# Altium PCB HamonLite_pcb.PcbDoc (part 1 of 2)
Units mm, origin at the board's own origin, x right, y up, seen from the top; angles counter-clockwise.
Board outline 85 x 83.5 mm, 4 copper layers (Top Layer, Int1 (GND), Int2 (PWR), Bottom Layer), stack 1.01 mm thick; 333 components, 256 nets, 1688 pads, 134 vias.
Unrouted connection lines stored in the file: 1037.
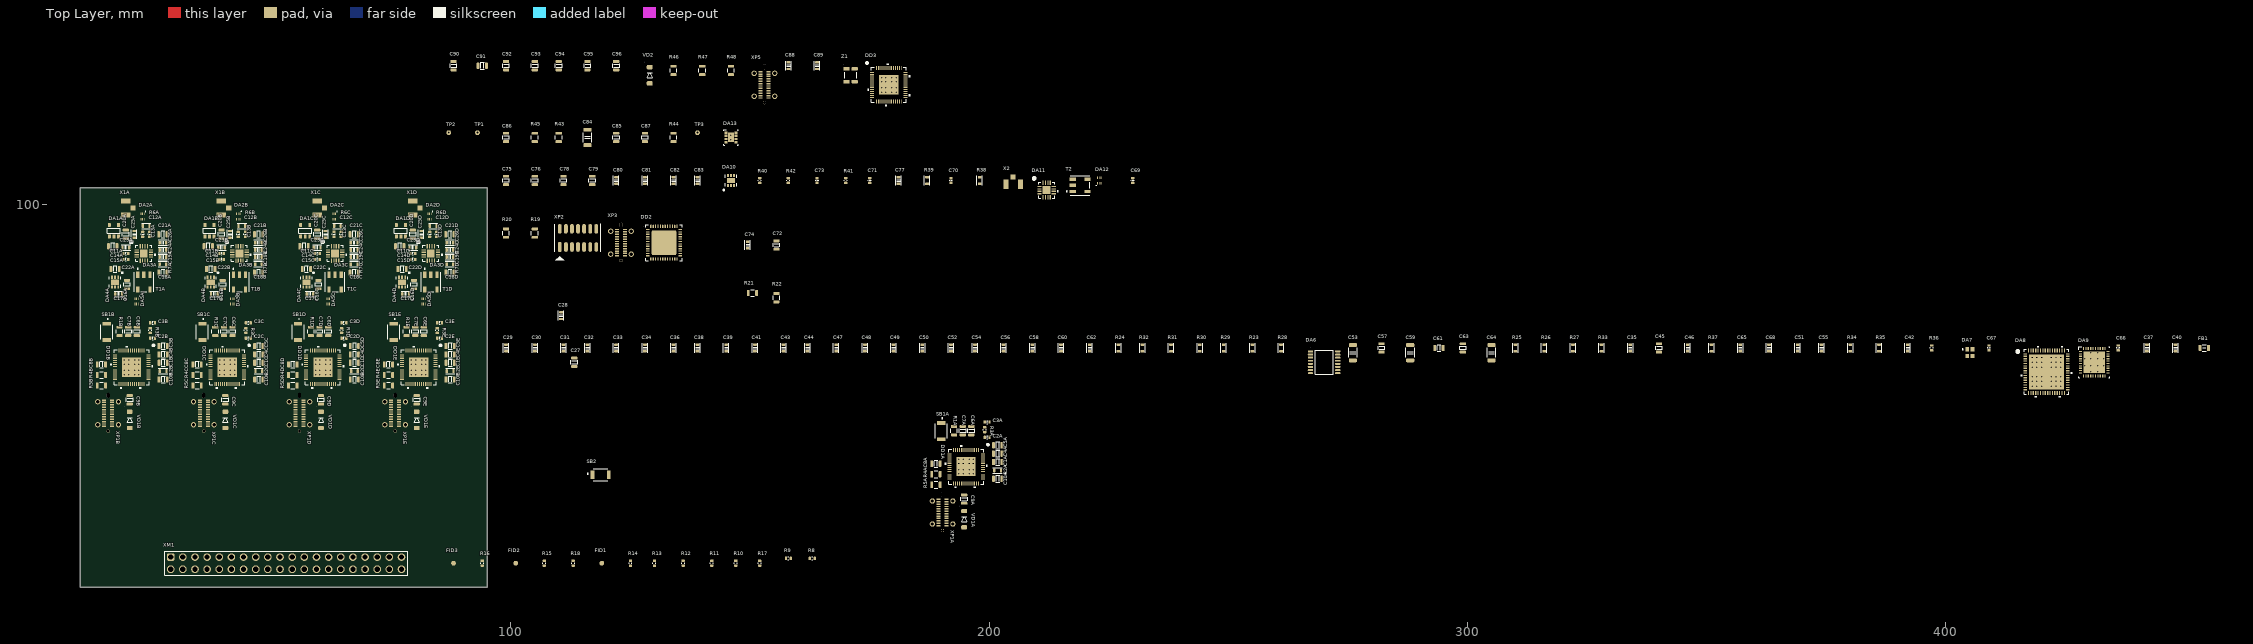
[diagram p0: Top Layer view]
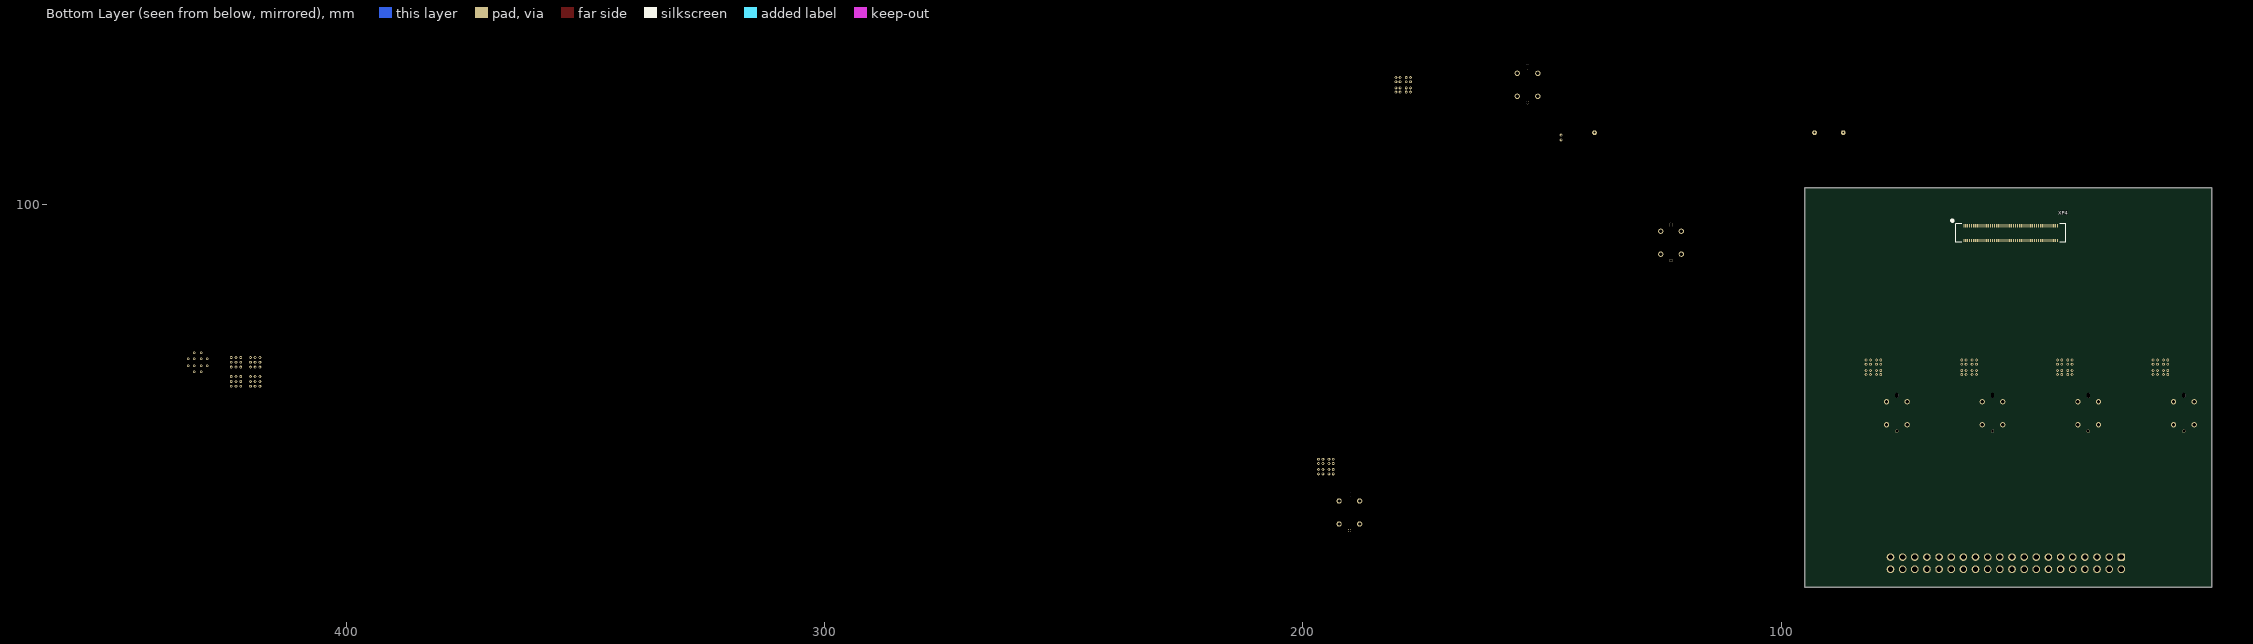
[diagram p1: Bottom Layer view, seen from below]

## Layer stack, top to bottom
Top Solder: solder mask 0.0254, SM-001, Dk 4
Top Layer: signal copper 0.0175
Dielectric 1: prepreg 0.115, PP-016, Dk 4.4
Int1 (GND): signal copper 0.0175
Dielectric 3: core 0.71, Core-043, Dk 4.3
Int2 (PWR): signal copper 0.0175
Dielectric 5: prepreg 0.115, PP-016, Dk 4.4
Bottom Layer: signal copper 0.0175
Bottom Solder: solder mask 0.0254, SM-001, Dk 4

## Board outline
10,20 10,103.5 95,103.5 95,20

## Design rules (kind name [scope] priority, off if disabled: settings)
AcuteAngle [All] p1: minimum=3.50000000000000E+0001 checktracksonly=FALSE
BoardOutlineClearance "BoardOutlineClearance 1" [All] p1: gap=0.25 ignorepadtopadclearanceinfootprint=FALSE except(0: Arc-SplitContinuation Track-SplitContinuation SMDPad-OutlineEdge SMDPad-SplitContinuation THPad-SplitContinuation Via-SplitContinuation Fill-SplitContinuation Poly-SplitContinuation Region-SplitContinuation Text-SplitContinuation) // Milling
BoardOutlineClearance "BoardOutlineClearance 2" [All] p2: gap=0.4 ignorepadtopadclearanceinfootprint=FALSE except(0: Arc-SplitContinuation Track-SplitContinuation SMDPad-SplitContinuation THPad-SplitContinuation Via-SplitContinuation Fill-SplitContinuation Poly-SplitContinuation Region-SplitContinuation Text-SplitContinuation) // V-Cut
Clearance "Fid Poly Clearance" [HasFootprint('FIDMARK')] p1: gap=0.2 ignorepadtopadclearanceinfootprint=FALSE except(0.8: SMDPad-Fill SMDPad-Poly SMDPad-Region THPad-Fill THPad-Poly THPad-Region)
Clearance "Clearance-1 1/2 Oz" [All] p2: gap=0.125 ignorepadtopadclearanceinfootprint=TRUE except(0.2: Arc-Fill Arc-Poly Track-Fill Track-Poly SMDPad-SMDPad SMDPad-Fill SMDPad-Poly THPad-Fill THPad-Poly Via-Fill Via-Poly Fill-Fill Fill-Poly Poly-Poly Poly-Region Poly-Text; 0.25: Arc-Hole Track-Hole SMDPad-Hole THPad-Hole Via-Hole Fill-Hole Poly-Hole Region-Hole Text-Hole) // Standart
DiffPairsRouting "DiffPairsRouting 1/2 Oz" [All] p1: maxlimit=0.254 minlimit=0.15 mostfreqgap=0.254 toplayer_minwidth=0.15 toplayer_maxwidth=0.381 toplayer_prefwidth=0.381 midlayer1_minwidth=0.15 midlayer1_maxwidth=0.381 midlayer1_prefwidth=0.381 midlayer2_minwidth=0.15 midlayer2_maxwidth=0.381 midlayer2_prefwidth=0.381 bottomlayer_minwidth=0.15 bottomlayer_maxwidth=0.381 bottomlayer_prefwidth=0.381 maxuncoupledlength=12.7
HoleSize "Minimum HoleSize" [IsPad] p1: absolutevalues=TRUE maxlimit=5.9 minlimit=0.3 maxpercent=80.000 minpercent=20.000
HoleSize "Minimum HoleSize VIA 1" [IsVia] p2: absolutevalues=TRUE maxlimit=4.5 minlimit=0.25 maxpercent=80.000 minpercent=20.000 // Standart
HoleToHoleClearance Hole2HoleClearance [All] p1: gap=0.2 allowstackedmicrovias=FALSE
MinimumAnnularRing "Minimum AR VIA Standart" [IsVia] p1: minimumring=0.15
MinimumAnnularRing "Minimum AR PAD Standart" [IsPAD] p2: minimumring=0.2
MinimumAnnularRing "Minimum AR VIA Advance" [IsVia] p3: minimumring=0.1
MinimumAnnularRing "Minimum AR PAD Advance" [IsPAD] p4: minimumring=0.15
MinimumSolderMaskSliver "SolderMask Bridge Standart" [All] p1: minsoldermaskwidth=0.09 // All Masks
PlaneClearance "PlaneClearance-1 1/2 Oz" [All] p1: clearance=2 // Standart
PlaneConnect "TermalConnect-1 1/2 Oz" [All] p1: planeconnectstyle=Relief reliefexpansion=0.2 reliefentries=4 reliefconductorwidth=0.2 reliefairgap=0.2 // Standart
PolygonConnect "PolygonConnect-1 1/2 Oz" [All] p1: thpad.connectstyle=Relief thpad.reliefconductorwidth=0.15 thpad.reliefentries=4 thpad.polygonreliefangle="90 Angle" thpad.airgapwidth=0.2 smdpad.connectstyle=Relief smdpad.reliefconductorwidth=0.2 smdpad.reliefentries=4 smdpad.polygonreliefangle="90 Angle" smdpad.airgapwidth=0.2 via.connectstyle=Direct via.reliefconductorwidth=0.254 via.reliefentries=4 via.polygonreliefangle="90 Angle" via.airgapwidth=0.254 // Standart
RoomDefinition RX [InComponentClass('RX')] p1: confinementstyle=ConfineIn formatcopy=TRUE lockcomponents=FALSE outline 185.7,56.8 185.7,29.5 205.7,29.5 205.7,56.8
RoomDefinition RX3 [InComponentClass('RX3')] p2: confinementstyle=ConfineIn formatcopy=TRUE lockcomponents=FALSE outline 71.25,77.55 71.25,50.25 91.25,50.25 91.25,77.55
RoomDefinition RX2 [InComponentClass('RX2')] p3: confinementstyle=ConfineIn formatcopy=TRUE lockcomponents=FALSE outline 51.25,77.55 51.25,50.25 71.25,50.25 71.25,77.55
RoomDefinition RX1 [InComponentClass('RX1')] p4: confinementstyle=ConfineIn formatcopy=TRUE lockcomponents=FALSE outline 31.25,77.55 31.25,50.25 51.25,50.25 51.25,77.55
RoomDefinition RX0 [InComponentClass('RX0')] p5: confinementstyle=ConfineIn formatcopy=TRUE lockcomponents=FALSE outline 11.25,77.55 11.25,50.25 31.25,50.25 31.25,77.55
RoomDefinition FE3 [InComponentClass('FE3')] p6: confinementstyle=ConfineIn formatcopy=TRUE lockcomponents=FALSE outline 75,103 75,78 90,78 90,103
RoomDefinition FE2 [InComponentClass('FE2')] p7: confinementstyle=ConfineIn formatcopy=TRUE lockcomponents=FALSE outline 55,103 55,78 70,78 70,103
RoomDefinition FE1 [InComponentClass('FE1')] p8: confinementstyle=ConfineIn formatcopy=TRUE lockcomponents=FALSE outline 35,103 35,78 50,78 50,103
RoomDefinition FE0 [InComponentClass('FE0')] p9: confinementstyle=ConfineIn formatcopy=TRUE lockcomponents=FALSE outline 15,103 15,78 30,78 30,103
RoutingCorners [All] p1 off: cornerstyle=45-Degree minsetback=2.54 maxsetback=2.54
RoutingVias [All] p1: holewidth=0.3 width=0.6 viastyle="Through Hole" minholewidth=0.2 minwidth=0.4 maxholewidth=5.9 maxwidth=6.4
SilkToSilkClearance Silk2SilkClearance [All] p1 off: silktosilkclearance=0.15
SilkToSolderMaskClearance Silk2SolderMaskClearance [IsPad] p1 off: minsilkscreentomaskgap=0.15 clearancetoexposedcopper=TRUE
SolderMaskExpansion SolderMaskExpansion-1 [All] p1: expansion=0.05 istentingtop=FALSE // Standart
UnRoutedNet [All] p1: checkbadconnections=TRUE
Width RF_trace [InNetClass('RF')] p1: maxlimit=0.447 minlimit=0.15 preferedwidth=0.447 impedanceprofiledriven=TRUE minimp=50.000000 maximp=50.000000 favimp=50.000000
Width "Width 1/2 Oz" [All] p2: maxlimit=0.5 minlimit=0.125 preferedwidth=0.25 checkconnectedcopper=TRUE
20 further rules are at their usual default settings.

## Classes and differential pairs
channel class s3-sdr: RX RX0 RX1 RX2 RX3
channel class frontend: FE0 FE1 FE2 FE3
net class SPI_CLK[0..4]: SPI_CLK0 SPI_CLK1 SPI_CLK2 SPI_CLK3 SPI_CLK4
net class RF: IFA IFB IFC IFD IFE NetC2A_2 NetC2B_2 NetC2C_2 NetC2D_2 NetC2E_2 NetC12A_2 NetC12B_2 NetC12C_2 NetC12D_2 NetC69_2 NetDA5A_1 NetDA5B_1 NetDA5C_1 NetDA5D_1 NetDA12_1 RF_IN0 RF_IN1 RF_IN2 RF_IN3
net class RF_IN[0..3]: RF_IN0 RF_IN1 RF_IN2 RF_IN3
net class PHASE_SYNC[0..3]: PHASE_SYNC0 PHASE_SYNC1 PHASE_SYNC2 PHASE_SYNC3
net class LO[0..3]: LO0 LO1 LO2 LO3
net class IO3S[0..4]: IO3S0 IO3S1 IO3S2 IO3S3 IO3S4
net class IO2S[0..4]: IO2S0 IO2S1 IO2S2 IO2S3 IO2S4
net class IO1S[0..4]: IO1S0 IO1S1 IO1S2 IO1S3 IO1S4
net class IO0S[0..4]: IO0S0 IO0S1 IO0S2 IO0S3 IO0S4
net class FE_SYNC_CLK: CLK_IN0 CLK_IN1 CLK_IN2 CLK_IN3 CLK_IN4 NetDA6_3 NetDA6_6 NetDA6_8 NetDA6_9 NetDA6_11
net class CS[0..4]: CS0 CS1 CS2 CS3 CS4
net class CLK_IN[0..4]: CLK_IN0 CLK_IN1 CLK_IN2 CLK_IN3 CLK_IN4
net class ANTBIAS[0..3]: ANTBIAS0 ANTBIAS1 ANTBIAS2 ANTBIAS3
component class U_s3_dsp: C88 C89 C90 C91 C92 C93 C94 C95 C96 DD3 R46 R47 R48 SB2 VD2 XP5 Z1
component class U_power: C84 C85 C86 C87 DA13 R43 R44 R45 TP1 TP2 TP3
component class U_frontend_tx: C69 C70 C71 C72 C73 C74 C75 C76 C77 C78 C79 C80 C81 C82 C83 DA10 DA11 DA12 R38 R39 R40 R41 R42 T2 X2
component class U_DSP_interconnect: DD2 R19 R20 R21 R22 XM1 XP2 XP3
component class U_clock: C27 C28 C29 C30 C31 C32 C33 C34 C35 C36 C37 C38 C39 C40 C41 C42 C43 C44 C45 C46 C47 C48 C49 C50 C51 C52 C53 C54 C55 C56 C57 C58 C59 C60 C61 C62 C63 C64 C65 C66 C67 C68 DA6 DA7 DA8 DA9 FB1 R23 R24 R25 R26 R27 R28 R29 R30 R31 R32 R33 R34 R35 R36 R37
component class U_b2b_ant_plate: XP4
component class RX: C1A C2A C3A C4A C5A C6A C7A C8A C9A C10A DD1A R1A R2A R3A R4A R5A SB1A VD1A XP1A
component class RX3: C1E C2E C3E C4E C5E C6E C7E C8E C9E C10E DD1E R1E R2E R3E R4E R5E SB1E VD1E XP1E
component class RX2: C1D C2D C3D C4D C5D C6D C7D C8D C9D C10D DD1D R1D R2D R3D R4D R5D SB1D VD1D XP1D
component class RX1: C1C C2C C3C C4C C5C C6C C7C C8C C9C C10C DD1C R1C R2C R3C R4C R5C SB1C VD1C XP1C
component class RX0: C1B C2B C3B C4B C5B C6B C7B C8B C9B C10B DD1B R1B R2B R3B R4B R5B SB1B VD1B XP1B
component class main: FID1 FID2 FID3 R8 R9 R10 R11 R12 R13 R14 R15 R16 R17 R18
component class FE3: C11D C12D C13D C14D C15D C16D C17D C18D C19D C20D C21D C22D C23D C24D C25D C26D DA1D DA2D DA3D DA4D DA5D R6D R7D T1D X1D
component class FE2: C11C C12C C13C C14C C15C C16C C17C C18C C19C C20C C21C C22C C23C C24C C25C C26C DA1C DA2C DA3C DA4C DA5C R6C R7C T1C X1C
component class FE1: C11B C12B C13B C14B C15B C16B C17B C18B C19B C20B C21B C22B C23B C24B C25B C26B DA1B DA2B DA3B DA4B DA5B R6B R7B T1B X1B
component class FE0: C11A C12A C13A C14A C15A C16A C17A C18A C19A C20A C21A C22A C23A C24A C25A C26A DA1A DA2A DA3A DA4A DA5A R6A R7A T1A X1A
differential pair USB_DE: +USB_DE_P -USB_DE_N
differential pair USB_DD: +USB_DD_P -USB_DD_N
differential pair USB_DC: +USB_DC_P -USB_DC_N
differential pair USB_DB: +USB_DB_P -USB_DB_N
differential pair USB_DA: +USB_DA_P -USB_DA_N
differential pair USB_D_9: +USB_D_9_P -USB_D_9_N
differential pair USB_D_4: +USB_D_4_P -USB_D_4_N
differential pair SYNTH_CLK_5: +SYNTH_CLK_5_P -SYNTH_CLK_5_N
differential pair IFD: +IFD_P -IFD_N
differential pair IFC: +IFC_P -IFC_N
differential pair IFB: +IFB_P -IFB_N
differential pair IFA: +IFA_P -IFA_N
differential pair IF_7: +IF_7_P -IF_7_N

## Components (designator, comment, footprint, x,y, rotation, side; value= is the part's Value field where it differs from the comment)
C1A "0.1" C0805C 201.75,46.15 r0 top (schematic designator C1)
C1B "0.1" C0805C 27.3,66.9 r0 top (schematic designator C1)
C1C "0.1" C0805C 47.3,66.9 r0 top (schematic designator C1)
C1D "0.1" C0805C 67.3,66.9 r0 top (schematic designator C1)
C1E "0.1" C0805C 87.3,66.9 r0 top (schematic designator C1)
C2A "DNP" C0402C 199.55,51.3 r180 top (schematic designator C2)
C2B "DNP" C0402C 25.1,72.05 r180 top (schematic designator C2)
C2C "DNP" C0402C 45.1,72.05 r180 top (schematic designator C2)
C2D "DNP" C0402C 65.1,72.05 r180 top (schematic designator C2)
C2E "DNP" C0402C 85.1,72.05 r180 top (schematic designator C2)
C3A "DNP" C0402C 199.55,54.5 r180 top (schematic designator C3)
C3B "DNP" C0402C 25.1,75.25 r180 top (schematic designator C3)
C3C "DNP" C0402C 45.1,75.25 r180 top (schematic designator C3)
C3D "DNP" C0402C 65.1,75.25 r180 top (schematic designator C3)
C3E "DNP" C0402C 85.1,75.25 r180 top (schematic designator C3)
C4A "0.1" C0805C 201.75,47.9 r0 top (schematic designator C4)
C4B "0.1" C0805C 27.3,68.65 r0 top (schematic designator C4)
C4C "0.1" C0805C 47.3,68.65 r0 top (schematic designator C4)
C4D "0.1" C0805C 67.3,68.65 r0 top (schematic designator C4)
C4E "0.1" C0805C 87.3,68.65 r0 top (schematic designator C4)
C5A "0.1" C0805C 201.75,49.65 r0 top (schematic designator C5)
C5B "0.1" C0805C 27.3,70.4 r0 top (schematic designator C5)
C5C "0.1" C0805C 47.3,70.4 r0 top (schematic designator C5)
C5D "0.1" C0805C 67.3,70.4 r0 top (schematic designator C5)
C5E "0.1" C0805C 87.3,70.4 r0 top (schematic designator C5)
C6A "0.1" C0805C 196.25,52.7 r90 top (schematic designator C6)
C6B "0.1" C0805C 21.8,73.45 r90 top (schematic designator C6)
C6C "0.1" C0805C 41.8,73.45 r90 top (schematic designator C6)
C6D "0.1" C0805C 61.8,73.45 r90 top (schematic designator C6)
C6E "0.1" C0805C 81.8,73.45 r90 top (schematic designator C6)
C7A "0.1" C0805C 194.45,52.7 r90 top (schematic designator C7)
C7B "0.1" C0805C 20,73.45 r90 top (schematic designator C7)
C7C "0.1" C0805C 40,73.45 r90 top (schematic designator C7)
C7D "0.1" C0805C 60,73.45 r90 top (schematic designator C7)
C7E "0.1" C0805C 80,73.45 r90 top (schematic designator C7)
C8A "0.1" C0805C 188.85,45.8 r180 top (schematic designator C8)
C8B "0.1" C0805C 14.4,66.55 r180 top (schematic designator C8)
C8C "0.1" C0805C 34.4,66.55 r180 top (schematic designator C8)
C8D "0.1" C0805C 54.4,66.55 r180 top (schematic designator C8)
C8E "0.1" C0805C 74.4,66.55 r180 top (schematic designator C8)
C9A "0.1" C0805C 194.75,38.4 r270 top (schematic designator C9)
C9B "0.1" C0805C 20.3,59.15 r270 top (schematic designator C9)
C9C "0.1" C0805C 40.3,59.15 r270 top (schematic designator C9)
C9D "0.1" C0805C 60.3,59.15 r270 top (schematic designator C9)
C9E "0.1" C0805C 80.3,59.15 r270 top (schematic designator C9)
C10A "0.1" C0805C 201.75,42.65 r0 top (schematic designator C10)
C10B "0.1" C0805C 27.3,63.4 r0 top (schematic designator C10)
C10C "0.1" C0805C 47.3,63.4 r0 top (schematic designator C10)
C10D "0.1" C0805C 67.3,63.4 r0 top (schematic designator C10)
C10E "0.1" C0805C 87.3,63.4 r0 top (schematic designator C10)
C11A "1" C0805C 16.75,91.25 r0 top (schematic designator C11)
C11B "1" C0805C 36.75,91.25 r0 top (schematic designator C11)
C11C "1" C0805C 56.75,91.25 r0 top (schematic designator C11)
C11D "1" C0805C 76.75,91.25 r0 top (schematic designator C11)
C12A "1000p" C0402C 23,93.75 r270 top (schematic designator C12)
C12B "1000p" C0402C 43,93.75 r270 top (schematic designator C12)
C12C "1000p" C0402C 63,93.75 r270 top (schematic designator C12)
C12D "1000p" C0402C 83,93.75 r270 top (schematic designator C12)
C13A "1000p" C0402C 24.5,93.75 r90 top (schematic designator C13)
C13B "1000p" C0402C 44.5,93.75 r90 top (schematic designator C13)
C13C "1000p" C0402C 64.5,93.75 r90 top (schematic designator C13)
C13D "1000p" C0402C 84.5,93.75 r90 top (schematic designator C13)
C14A "1000p" C0402C 19.5,89.75 r0 top (schematic designator C14)
C14B "1000p" C0402C 39.5,89.75 r0 top (schematic designator C14)
C14C "1000p" C0402C 59.5,89.75 r0 top (schematic designator C14)
C14D "1000p" C0402C 79.5,89.75 r0 top (schematic designator C14)
C15A "1000p" C0402C 19.5,88.5 r0 top (schematic designator C15)
C15B "1000p" C0402C 39.5,88.5 r0 top (schematic designator C15)
C15C "1000p" C0402C 59.5,88.5 r0 top (schematic designator C15)
C15D "1000p" C0402C 79.5,88.5 r0 top (schematic designator C15)
C16A "22" C0805C 19.75,83.25 r90 top (schematic designator C16)
C16B "22" C0805C 39.75,83.25 r90 top (schematic designator C16)
C16C "22" C0805C 59.75,83.25 r90 top (schematic designator C16)
C16D "22" C0805C 79.75,83.25 r90 top (schematic designator C16)
C17A "100p" C0603C 18,81.25 r0 top (schematic designator C17)
C17B "100p" C0603C 38,81.25 r0 top (schematic designator C17)
C17C "100p" C0603C 58,81.25 r0 top (schematic designator C17)
C17D "100p" C0603C 78,81.25 r0 top (schematic designator C17)
C18A "0.1" C0805C 27.25,85.75 r0 top (schematic designator C18)
C18B "0.1" C0805C 47.25,85.75 r0 top (schematic designator C18)
C18C "0.1" C0805C 67.25,85.75 r0 top (schematic designator C18)
C18D "0.1" C0805C 87.25,85.75 r0 top (schematic designator C18)
C19A "100p" C0603C 27.25,89 r0 top (schematic designator C19)
C19B "100p" C0603C 47.25,89 r0 top (schematic designator C19)
C19C "100p" C0603C 67.25,89 r0 top (schematic designator C19)
C19D "100p" C0603C 87.25,89 r0 top (schematic designator C19)
C20A "0.1" C0805C 19.5,93.75 r90 top (schematic designator C20)
C20B "0.1" C0805C 39.5,93.75 r90 top (schematic designator C20)
C20C "0.1" C0805C 59.5,93.75 r90 top (schematic designator C20)
C20D "0.1" C0805C 79.5,93.75 r90 top (schematic designator C20)
C21A "0.1" C0805C 27.25,93.75 r0 top (schematic designator C21)
C21B "0.1" C0805C 47.25,93.75 r0 top (schematic designator C21)
C21C "0.1" C0805C 67.25,93.75 r0 top (schematic designator C21)
C21D "0.1" C0805C 87.25,93.75 r0 top (schematic designator C21)
C22A "0.1" C0805C 17.25,86.5 r180 top (schematic designator C22)
C22B "0.1" C0805C 37.25,86.5 r180 top (schematic designator C22)
C22C "0.1" C0805C 57.25,86.5 r180 top (schematic designator C22)
C22D "0.1" C0805C 77.25,86.5 r180 top (schematic designator C22)
C23A "100p" C0603C 19.5,91 r180 top (schematic designator C23)
C23B "100p" C0603C 39.5,91 r180 top (schematic designator C23)
C23C "100p" C0603C 59.5,91 r180 top (schematic designator C23)
C23D "100p" C0603C 79.5,91 r180 top (schematic designator C23)
C24A "100p" C0603C 27.25,90.5 r0 top (schematic designator C24)
C24B "100p" C0603C 47.25,90.5 r0 top (schematic designator C24)
C24C "100p" C0603C 67.25,90.5 r0 top (schematic designator C24)
C24D "100p" C0603C 87.25,90.5 r0 top (schematic designator C24)
C25A "100p" C0603C 21.25,93.75 r90 top (schematic designator C25)
C25B "100p" C0603C 41.25,93.75 r90 top (schematic designator C25)
C25C "100p" C0603C 61.25,93.75 r90 top (schematic designator C25)
C25D "100p" C0603C 81.25,93.75 r90 top (schematic designator C25)
C26A "100p" C0603C 27.25,92 r0 top (schematic designator C26)
C26B "100p" C0603C 47.25,92 r0 top (schematic designator C26)
C26C "100p" C0603C 67.25,92 r0 top (schematic designator C26)
C26D "100p" C0603C 87.25,92 r0 top (schematic designator C26)
C27 "10" C0805C 113.25,67 r90 top
C28 "1" C0603C 110.5,76.75 r90 top
C29 "0.1" C0603C 99,70 r90 top
C30 "0.1" C0603C 105,70 r90 top
C31 "0.1" C0603C 111,70 r90 top
C32 "0.1" C0603C 116,70 r90 top
C33 "0.1" C0603C 122,70 r90 top
C34 "0.1" C0603C 128,70 r90 top
C35 "0.1" C0603C 334,70 r90 top
C36 "0.1" C0603C 134,70 r90 top
C37 "1" C0603C 442,70 r90 top
C38 "0.1" C0603C 139,70 r90 top
C39 "0.1" C0603C 145,70 r90 top
C40 "0.1" C0603C 448,70 r90 top
C41 "0.1" C0603C 151,70 r90 top
C42 "0.1" C0603C 392,70 r90 top
C43 "0.1" C0603C 157,70 r90 top
C44 "0.1" C0603C 162,70 r90 top
C45 "10" C0805C 340,70 r90 top
C46 "0.1" C0603C 346,70 r90 top
C47 "1" C0603C 168,70 r90 top
C48 "0.1" C0603C 174,70 r90 top
C49 "0.1" C0603C 180,70 r90 top
C50 "0.1" C0603C 186,70 r90 top
C51 "82p" C0603C 369,70 r90 top
C52 "0.1" C0603C 192,70 r90 top
C53 "10" C1206C 276,69 r90 top
C54 "0.1" C0603C 197,70 r90 top
C55 "2200p" C0603C 374,70 r90 top
C56 "0.1" C0603C 203,70 r90 top
C57 "0.1" C0805C 282,70 r90 top
C58 "0.1" C0603C 209,70 r90 top
C59 "10" C1206C 288,69 r90 top
C60 "0.1" C0603C 215,70 r90 top
C61 "0.47" C0805C 294,70 r0 top
C62 "0.1" C0603C 221,70 r90 top
C63 "0.1" C0805C 299,70 r90 top
C64 "10" C1206C 305,69 r90 top
C65 "2200p" C0603C 357,70 r90 top
C66 "0.01" C0402C 436,70 r90 top
C67 "0.01" C0402C 409,70 r90 top
C68 "0.015" C0603C 363,70 r90 top
C69 "1000p" C0402C 230,105 r90 top
C70 "1000p" C0402C 192,105 r90 top
C71 "1000p" C0402C 175,105 r90 top
C72 "22" C0805C 155.5,91.5 r90 top
C73 "1000p" C0402C 164,105 r90 top
C74 "100p" C0603C 149.5,91.5 r90 top
C75 "0.1" C0805C 99,105 r90 top
C76 "0.1" C0805C 105,105 r90 top
C77 "100p" C0603C 181,105 r90 top
C78 "0.1" C0805C 111,105 r90 top
C79 "0.1" C0805C 117,105 r90 top
C80 "100p" C0603C 122,105 r90 top
C81 "100p" C0603C 128,105 r90 top
C82 "100p" C0603C 134,105 r90 top
C83 "100p" C0603C 139,105 r90 top
C84 "100" C1206C 116,114 r90 top
C85 "22" C0805C 122,114 r90 top
C86 "3.3" C0805C 99,114 r90 top
C87 "22" C0805C 128,114 r90 top
C88 "22p" C0603C 158,129 r90 top
C89 "22p" C0603C 164,129 r90 top
C90 "0.1" C0805C 88,129 r90 top
C91 "0.1" C0805C 94,129 r0 top
C92 "0.1" C0805C 99,129 r90 top
C93 "0.1" C0805C 105,129 r90 top
C94 "0.1" C0805C 110,129 r90 top
C95 "0.1" C0805C 116,129 r90 top
C96 "0.1" C0805C 122,129 r90 top
DA1A "LP5079MFX-3.0" SOT23-5 17,94.5 r90 top (schematic designator DA1)
DA1B "LP5079MFX-3.0" SOT23-5 37,94.5 r90 top (schematic designator DA1)
DA1C "LP5079MFX-3.0" SOT23-5 57,94.5 r90 top (schematic designator DA1)
DA1D "LP5079MFX-3.0" SOT23-5 77,94.5 r90 top (schematic designator DA1)
DA2A "MXD8721" SON35P100X50-6N 23,97.5 r270 top (schematic designator DA2)
DA2B "MXD8721" SON35P100X50-6N 43,97.5 r270 top (schematic designator DA2)
DA2C "MXD8721" SON35P100X50-6N 63,97.5 r270 top (schematic designator DA2)
DA2D "MXD8721" SON35P100X50-6N 83,97.5 r270 top (schematic designator DA2)
DA3A "AD8342ACPZ-REEL7" CP_16_27_ADI-M 23.25,89.75 r0 top (schematic designator DA3)
DA3B "AD8342ACPZ-REEL7" CP_16_27_ADI-M 43.25,89.75 r0 top (schematic designator DA3)
DA3C "AD8342ACPZ-REEL7" CP_16_27_ADI-M 63.25,89.75 r0 top (schematic designator DA3)
DA3D "AD8342ACPZ-REEL7" CP_16_27_ADI-M 83.25,89.75 r0 top (schematic designator DA3)
DA4A "ADP7118ACPZN5.0-R7" CP-6-3_ADI 17.25,83.75 r270 top (schematic designator DA4)
DA4B "ADP7118ACPZN5.0-R7" CP-6-3_ADI 37.25,83.75 r270 top (schematic designator DA4)
DA4C "ADP7118ACPZN5.0-R7" CP-6-3_ADI 57.25,83.75 r270 top (schematic designator DA4)
DA4D "ADP7118ACPZN5.0-R7" CP-6-3_ADI 77.25,83.75 r270 top (schematic designator DA4)
DA5A "MXD8721" SON35P100X50-6N 21.75,79.75 r270 top (schematic designator DA5)
DA5B "MXD8721" SON35P100X50-6N 41.75,79.75 r270 top (schematic designator DA5)
DA5C "MXD8721" SON35P100X50-6N 61.75,79.75 r270 top (schematic designator DA5)
DA5D "MXD8721" SON35P100X50-6N 81.75,79.75 r270 top (schematic designator DA5)
DA6 "CDCLVC1108PW" TSSOP16 270,67 r0 top
DA7 "NT2016SA-32MHz-END4263A" OSC_CX2016DB16000D0WZRC1 405,69 r0 top
DA8 "LMK04228NKDR" WQFN64_NKD_TEX 421,65 r0 top
DA9 "LMX2572RHAR" RHA0040H 431,67 r0 top
DA10 "ADP7118ACPZN5.0-R7" CP-6-3_ADI 146,105 r90 top
DA11 "AD8342ACPZ-REEL7" CP_16_27_ADI-M 212,103 r0 top
DA12 "MXD8721" SON35P100X50-6N 223,105 r90 top
DA13 "TPS82130SILR" SIL0008D_SMD 146,114 r0 top
DD1A "ESP32-S3FH4R2" QFN56_7X7_EXP-M 195.15,45.2 r270 top (schematic designator DD1)
DD1B "ESP32-S3FH4R2" QFN56_7X7_EXP-M 20.7,65.95 r270 top (schematic designator DD1)
DD1C "ESP32-S3FH4R2" QFN56_7X7_EXP-M 40.7,65.95 r270 top (schematic designator DD1)
DD1D "ESP32-S3FH4R2" QFN56_7X7_EXP-M 60.7,65.95 r270 top (schematic designator DD1)
DD1E "ESP32-S3FH4R2" QFN56_7X7_EXP-M 80.7,65.95 r270 top (schematic designator DD1)
DD2 "STM32G491CCU6" QFN48 132,92 r0 top
DD3 "ESP32-S3FH4R2" QFN56_7X7_EXP-M 179,125 r0 top
FB1 "" C0805I 454,70 r0 top
FID1 "Fidmark" FidMark 119,25 r0 top
FID2 "Fidmark" FidMark 101,25 r90 top
FID3 "Fidmark" FidMark 88,25 r90 top
R1A "10k" C0805R 192.65,52.7 r270 top (schematic designator R1)
R1B "10k" C0805R 18.2,73.45 r270 top (schematic designator R1)
R1C "10k" C0805R 38.2,73.45 r270 top (schematic designator R1)
R1D "10k" C0805R 58.2,73.45 r270 top (schematic designator R1)
R1E "10k" C0805R 78.2,73.45 r270 top (schematic designator R1)
R2A "DNP" C0603R 201.75,44.4 r0 top (schematic designator R2)
R2B "DNP" C0603R 27.3,65.15 r0 top (schematic designator R2)
R2C "DNP" C0603R 47.3,65.15 r0 top (schematic designator R2)
R2D "DNP" C0603R 67.3,65.15 r0 top (schematic designator R2)
R2E "DNP" C0603R 87.3,65.15 r0 top (schematic designator R2)
R3A "0" C0402R 199.05,52.9 r270 top (schematic designator R3)
R3B "0" C0402R 24.6,73.65 r270 top (schematic designator R3)
R3C "0" C0402R 44.6,73.65 r270 top (schematic designator R3)
R3D "0" C0402R 64.6,73.65 r270 top (schematic designator R3)
R3E "0" C0402R 84.6,73.65 r270 top (schematic designator R3)
R4A "5.1k" C0805R 188.85,43.6 r0 top (schematic designator R4)
R4B "5.1k" C0805R 14.4,64.35 r0 top (schematic designator R4)
R4C "5.1k" C0805R 34.4,64.35 r0 top (schematic designator R4)
R4D "5.1k" C0805R 54.4,64.35 r0 top (schematic designator R4)
R4E "5.1k" C0805R 74.4,64.35 r0 top (schematic designator R4)
R5A "5.1k" C0805R 188.85,41.4 r180 top (schematic designator R5)
R5B "5.1k" C0805R 14.4,62.15 r180 top (schematic designator R5)
R5C "5.1k" C0805R 34.4,62.15 r180 top (schematic designator R5)
R5D "5.1k" C0805R 54.4,62.15 r180 top (schematic designator R5)
R5E "5.1k" C0805R 74.4,62.15 r180 top (schematic designator R5)
R6A "100" C0603R 23.75,95.5 r0 top (schematic designator R6)
R6B "100" C0603R 43.75,95.5 r0 top (schematic designator R6)
R6C "100" C0603R 63.75,95.5 r0 top (schematic designator R6)
R6D "100" C0603R 83.75,95.5 r0 top (schematic designator R6)
R7A "1.82k" C0603R 27.25,87.5 r0 top (schematic designator R7)
R7B "1.82k" C0603R 47.25,87.5 r0 top (schematic designator R7)
R7C "1.82k" C0603R 67.25,87.5 r0 top (schematic designator R7)
R7D "1.82k" C0603R 87.25,87.5 r0 top (schematic designator R7)
R8 "8.33" C0402R 163,26 r0 top
R9 "8.33" C0402R 158,26 r0 top
R10 "8.33" C0402R 147,25 r90 top
R11 "8.33" C0402R 142,25 r90 top
R12 "8.33" C0402R 136,25 r90 top
R13 "8.33" C0402R 130,25 r90 top
R14 "8.33" C0402R 125,25 r90 top
R15 "8.33" C0402R 107,25 r90 top
R16 "8.33" C0402R 94,25 r90 top
R17 "8.33" C0402R 152,25 r90 top
R18 "8.33" C0402R 113,25 r90 top
R19 "10k" C0805R 105,94 r90 top
R20 "10k" C0805R 99,94 r90 top
R21 "5.1k" C0805R 150.5,81.5 r0 top
R22 "5.1k" C0805R 155.5,80.5 r90 top
R23 "33" C0603R 255,70 r90 top
R24 "10k" C0603R 227,70 r90 top
R25 "10k" C0603R 310,70 r90 top
R26 "10k" C0603R 316,70 r90 top
R27 "10k" C0603R 322,70 r90 top
R28 "33" C0603R 261,70 r90 top
R29 "33" C0603R 249,70 r90 top
R30 "33" C0603R 244,70 r90 top
R31 "33" C0603R 238,70 r90 top
R32 "33" C0603R 232,70 r90 top
R33 "10k" C0603R 328,70 r90 top
R34 "10k" C0603R 380,70 r90 top
R35 "1k8" C0603R 386,70 r90 top
R36 "49.9" C0402R 397,70 r90 top
R37 "330" C0603R 351,70 r90 top
R38 "100" C0603R 198,105 r90 top
R39 "1.82k" C0603R 187,105 r90 top
R40 "*" C0402R 152,105 r90 top
R41 "*" C0402R 170,105 r90 top
R42 "*" C0402R 158,105 r90 top
R43 "100k" C0805R 110,114 r90 top
R44 "316k" C0805R 134,114 r90 top
R45 "100k" C0805R 105,114 r90 top
R46 "10k" C0805R 134,128 r90 top
R47 "5.1k" C0805R 140,128 r90 top
R48 "5.1k" C0805R 146,128 r90 top
SB1A "SW B3U-1000P" SW_B3U-1000P 189.95,52.6 r270 top (schematic designator SB1)
SB1B "SW B3U-1000P" SW_B3U-1000P 15.5,73.35 r270 top (schematic designator SB1)
SB1C "SW B3U-1000P" SW_B3U-1000P 35.5,73.35 r270 top (schematic designator SB1)
SB1D "SW B3U-1000P" SW_B3U-1000P 55.5,73.35 r270 top (schematic designator SB1)
SB1E "SW B3U-1000P" SW_B3U-1000P 75.5,73.35 r270 top (schematic designator SB1)
SB2 "*" SW_B3U-1000P 118.75,43.5 r0 top
T1A "TC1-1T+" AT224-1A_MNC 23.25,83.75 r270 top (schematic designator T1)
T1B "TC1-1T+" AT224-1A_MNC 43.25,83.75 r270 top (schematic designator T1)
T1C "TC1-1T+" AT224-1A_MNC 63.25,83.75 r270 top (schematic designator T1)
T1D "TC1-1T+" AT224-1A_MNC 83.25,83.75 r270 top (schematic designator T1)
T2 "TC1-1T+" AT224-1A_MNC 219,104 r0 top
TP1 "" TestPoint 93,115 r90 top
TP2 "" TestPoint 87,115 r90 top
TP3 "" TestPoint 139,115 r90 top
VD1A "BAT760" SOD123 194.75,34.2 r90 top (schematic designator VD1)
VD1B "BAT760" SOD123 20.3,54.95 r90 top (schematic designator VD1)
VD1C "BAT760" SOD123 40.3,54.95 r90 top (schematic designator VD1)
VD1D "BAT760" SOD123 60.3,54.95 r90 top (schematic designator VD1)
VD1E "BAT760" SOD123 80.3,54.95 r90 top (schematic designator VD1)
VD2 "BAT760" SOD123 129,127 r90 top
X1A "" "IPEX PAD" 20.25,99.25 r270 top (schematic designator X1)
X1B "" "IPEX PAD" 40.25,99.25 r270 top (schematic designator X1)
X1C "" "IPEX PAD" 60.25,99.25 r270 top (schematic designator X1)
X1D "" "IPEX PAD" 80.25,99.25 r270 top (schematic designator X1)
X2 "" "IPEX PAD" 205,105 r0 top
XM1 "Tang-40-PIN" TANG-40PIN 53,25 r0 top
XP1A "L-KLS1-5422" L-KLS1-5422 190.25,35.6 r90 top (schematic designator XP1)
XP1B "L-KLS1-5422" L-KLS1-5422 15.8,56.35 r90 top (schematic designator XP1)
XP1C "L-KLS1-5422" L-KLS1-5422 35.8,56.35 r90 top (schematic designator XP1)
XP1D "L-KLS1-5422" L-KLS1-5422 55.8,56.35 r90 top (schematic designator XP1)
XP1E "L-KLS1-5422" L-KLS1-5422 75.8,56.35 r90 top (schematic designator XP1)
XP2 "ConnectorPin-6_Table" PLLD-1.27-14S 114,93 r0 top
XP3 "L-KLS1-5422" L-KLS1-5422 123,92 r90 top
XP4 "DF40C-100DS-0.4V51" CONN_DF40C-100DS-0.4V51_HIR 52,94 r180 bottom
XP5 "L-KLS1-5422" L-KLS1-5422 153,125 r90 top
Z1 "40M" DFN170P250X90-4N 171,127 r0 top

## Footprints (in the part's own frame and the unit in brackets; to place one, negate y for a bottom-side part, rotate by r counter-clockwise, add the part's x,y. Pads: shape width x height; smd on the part's side, far side on the other; paste and mask are expansions set on the pad)
AT224-1A_MNC [mil]
  rect 52x26 smd paste+0 mask+0: 1(-61,-50) 2(-61,0) 3(-61,50) 4(61,50) 6(61,-50)
  silkscreen extent -114,-80 80,80
C0402C [mm]
  rrect50% 0.5x0.7 smd: 1(-0.5,0) 2(0.5,0)
  silkscreen extent -0.1,-0.3 0.1,0.3, body extent -0.5,-0.28 0.5,0.28, height 0.5
C0402R [mm]
  rrect50% 0.5x0.7 smd: 1(-0.5,0) 2(0.5,0)
  silkscreen extent -0.1,-0.3 0.1,0.3, body extent -0.5,-0.28 0.5,0.28, height 0.5
C0603C [mm]
  rrect50% 0.5x0.8 smd: 1(-0.7,0) 2(0.7,0)
  silkscreen extent -0.97,-0.58 0.97,0.58, body extent -0.8,-0.4 0.8,0.4, height 0.5
C0603R [mm]
  rrect50% 0.5x0.8 smd: 1(-0.7,0) 2(0.7,0)
  silkscreen extent -0.97,-0.58 0.97,0.58, body extent -0.7,-0.41 0.7,0.41, height 0.45
C0805C [mm]
  rrect50% 0.6x1.3 smd: 1(-0.875,0) 2(0.875,0)
  silkscreen extent -0.4,-0.7 0.4,0.7, body extent -1,-0.6 1,0.6, height 0.8
C0805I [mm]
  rrect50% 0.6x1.3 smd: 1(-0.875,0) 2(0.875,0)
  silkscreen extent -0.4,-0.7 0.4,0.7, body extent -1,-0.6 1,0.6, height 0.8
C0805R [mm]
  rrect50% 0.6x1.3 smd: 1(-0.875,0) 2(0.875,0)
  silkscreen extent -0.4,-0.7 0.4,0.7, body extent -1,-0.6 1,0.6, height 0.5
C1206C [mm]
  rrect50% 0.8x1.7 smd: 1(-1.6,0) 2(1.6,0)
  silkscreen extent -1,-0.9 1,0.9, body extent -1.7,-0.8 1.7,0.8, height 0.8
CONN_DF40C-100DS-0.4V51_HIR [mm]
  rect 0.229x0.711 smd paste+0 mask+0: 1(-9.8,-1.54) 2(-9.4,-1.54) 3(-9,-1.54) 4(-8.6,-1.54) 5(-8.2,-1.54) 6(-7.8,-1.54) 7(-7.4,-1.54) 8(-7,-1.54) 9(-6.6,-1.54) 10(-6.2,-1.54) 11(-5.8,-1.54) 12(-5.4,-1.54) 13(-5,-1.54) 14(-4.6,-1.54) 15(-4.2,-1.54) 16(-3.8,-1.54) 17(-3.4,-1.54) 18(-3,-1.54) 19(-2.6,-1.54) 20(-2.2,-1.54) 21(-1.8,-1.54) 22(-1.4,-1.54) 23(-1,-1.54) 24(-0.6,-1.54) 25(-0.2,-1.54) 26(0.2,-1.54) 27(0.6,-1.54) 28(1,-1.54) 29(1.4,-1.54) 30(1.8,-1.54) 31(2.2,-1.54) 32(2.6,-1.54) 33(3,-1.54) 34(3.4,-1.54) 35(3.8,-1.54) 36(4.2,-1.54) 37(4.6,-1.54) 38(5,-1.54) 39(5.4,-1.54) 40(5.8,-1.54) 41(6.2,-1.54) 42(6.6,-1.54) 43(7,-1.54) 44(7.4,-1.54) 45(7.8,-1.54) 46(8.2,-1.54) 47(8.6,-1.54) 48(9,-1.54) 49(9.4,-1.54) 50(9.8,-1.54) 51(-9.8,1.54) 52(-9.4,1.54) 53(-9,1.54) 54(-8.6,1.54) 55(-8.2,1.54) 56(-7.8,1.54) 57(-7.4,1.54) 58(-7,1.54) 59(-6.6,1.54) 60(-6.2,1.54) 61(-5.8,1.54) 62(-5.4,1.54) 63(-5,1.54) 64(-4.6,1.54) 65(-4.2,1.54) 66(-3.8,1.54) 67(-3.4,1.54) 68(-3,1.54) 69(-2.6,1.54) 70(-2.2,1.54) 71(-1.8,1.54) 72(-1.4,1.54) 73(-1,1.54) 74(-0.6,1.54) 75(-0.2,1.54) 76(0.2,1.54) 77(0.6,1.54) 78(1,1.54) 79(1.4,1.54) 80(1.8,1.54) 81(2.2,1.54) 82(2.6,1.54) 83(3,1.54) 84(3.4,1.54) 85(3.8,1.54) 86(4.2,1.54) 87(4.6,1.54) 88(5,1.54) 89(5.4,1.54) 90(5.8,1.54) 91(6.2,1.54) 92(6.6,1.54) 93(7,1.54) 94(7.4,1.54) 95(7.8,1.54) 96(8.2,1.54) 97(8.6,1.54) 98(9,1.54) 99(9.4,1.54) 100(9.8,1.54)
  silkscreen extent -12.4,-1.92 11.53,2.8, body extent -11.3,-1.69 11.3,1.69, height 1.4
CP-6-3_ADI [mm]
  rect 0.656x0.382 smd paste+0 mask+0: 1(-1.026,0.65) 2(-1.026,0) 3(-1.026,-0.65) 4(1.026,-0.65) 5(1.026,0) 6(1.026,0.65)
  rect 1.092x1.702 smd paste+0 mask+0: 7(0,0)
  silkscreen extent -2.08,-1.18 1.18,1.6, body extent -1.05,-1.05 1.05,1.05, height 0.56
CP_16_27_ADI-M [mm]
  rect 0.908x0.255 smd paste+0 mask+0: 1(-1.495,0.75) 2(-1.495,0.25) 3(-1.495,-0.25) 4(-1.495,-0.75) 9(1.495,-0.75) 10(1.495,-0.25) 11(1.495,0.25) 12(1.495,0.75)
  rect 0.255x0.908 smd paste+0 mask+0: 5(-0.75,-1.495) 6(-0.25,-1.495) 7(0.25,-1.495) 8(0.75,-1.495) 13(0.75,1.495) 14(0.25,1.495) 15(-0.25,1.495) 16(-0.75,1.495)
  rect 1.651x1.651 smd paste+0 mask+0: 17(0,0)
  silkscreen extent -2.86,-1.68 2.46,2.66, body extent -1.55,-1.55 1.55,1.55, height 0.81
DFN170P250X90-4N [mm] "DFN, 4-Leads, Body 3,20x2,50mm, Pitch 1,70mm, IPC Medium Density"
  rrect50% 1.35x0.75 smd: 1(-0.85,1.325) 2(-0.85,-1.325) 3(0.85,-1.325) 4(0.85,1.325)
  silkscreen extent -1.25,-0.62 1.25,0.62, body extent -1.25,-1.6 1.25,1.6, height 0.6
FidMark [mm]
  round 1 smd paste-2539.97 mask+1: 1(0,0)
"IPEX PAD" [mm]
  rect 1x1.05 smd: 1(-0.012,0.763)
  rect 1.05x2 smd: 2(-1.488,-0.763) 2(1.488,-0.763)
  body extent -1.5,-2.07 1.5,0.77, height 1.34
L-KLS1-5422 [mm]
  rect 0.3x0.85 smd: A1(-2.75,0.835) A2(-2.25,0.835) A3(-1.75,0.835) A4(-1.25,0.835) A5(-0.75,0.835) A6(-0.25,0.835) A7(0.25,0.835) A8(0.75,0.835) A9(1.25,0.835) A10(1.75,0.835) A11(2.25,0.835) A12(2.75,0.835) B1(2.75,-0.835) B2(2.25,-0.835) B3(1.75,-0.835) B4(1.25,-0.835) B5(0.75,-0.835) B6(0.25,-0.835) B7(-0.25,-0.835) B8(-0.75,-0.835) B9(-1.25,-0.835) B10(-1.75,-0.835) B11(-2.25,-0.835) B12(-2.75,-0.835)
  round 0.65 hole 0.65 unplated: ""(-3.75,0)
  round 1.1 hole 0.7: ""(-2.4,-2.15) ""(-2.4,2.15) ""(2.4,-2.15) ""(2.4,2.15)
  oval 1x0.6 hole 0.6 slot 1 at 0 deg unplated: ""(3.75,0)
  body extent -4.52,-2.3 4.52,2.3, height 6.55
OSC_CX2016DB16000D0WZRC1 [mm]
  rect 0.8x0.9 smd: 1(-0.55,0.7) 2(-0.55,-0.7) 3(0.55,-0.7) 4(0.55,0.7)
  silkscreen extent -1.6,0.6 -1.4,0.8, body extent -0.8,-1 0.8,1, height 0.45
PLLD-1.27-14S [mm]
  rrect50% 0.8x2 smd: 1(-3.78,-1.9)
  oval 0.8x2 smd: 2(-3.78,1.9) 3(-2.51,-1.9) 4(-2.51,1.9) 5(-1.24,-1.9) 6(-1.24,1.9) 7(0.03,-1.9) 8(0.03,1.9) 9(1.3,-1.9) 10(1.3,1.9) 11(2.57,-1.9) 12(2.57,1.9) 13(3.84,-1.9) 14(3.84,1.9)
  silkscreen extent -4.8,-4.7 4.8,3, body extent -4.41,-2.68 4.48,2.59, height 4.16
QFN48 [mm] "QFN, 48-Leads, Body 7,00x7,00mm, Pitch 0,50mm, Thermal Pad 5,15x5,15mm, IPC Medium Density"
  rrect50% 0.7x0.25 smd: 1(-3.4,2.75) 2(-3.4,2.25) 3(-3.4,1.75) 4(-3.4,1.25) 5(-3.4,0.75) 6(-3.4,0.25) 7(-3.4,-0.25) 8(-3.4,-0.75) 9(-3.4,-1.25) 10(-3.4,-1.75) 11(-3.4,-2.25) 12(-3.4,-2.75) 25(3.4,-2.75) 26(3.4,-2.25) 27(3.4,-1.75) 28(3.4,-1.25) 29(3.4,-0.75) 30(3.4,-0.25) 31(3.4,0.25) 32(3.4,0.75) 33(3.4,1.25) 34(3.4,1.75) 35(3.4,2.25) 36(3.4,2.75)
  rrect50% 0.25x0.7 smd: 13(-2.75,-3.4) 14(-2.25,-3.4) 15(-1.75,-3.4) 16(-1.25,-3.4) 17(-0.75,-3.4) 18(-0.25,-3.4) 19(0.25,-3.4) 20(0.75,-3.4) 21(1.25,-3.4) 22(1.75,-3.4) 23(2.25,-3.4) 24(2.75,-3.4) 37(2.75,3.4) 38(2.25,3.4) 39(1.75,3.4) 40(1.25,3.4) 41(0.75,3.4) 42(0.25,3.4) 43(-0.25,3.4) 44(-0.75,3.4) 45(-1.25,3.4) 46(-1.75,3.4) 47(-2.25,3.4) 48(-2.75,3.4)
  rrect10% 5.15x5.15 smd: 49(0,0)
  silkscreen extent -3.8,-3.8 3.8,3.8, body extent -3.6,-3.6 3.6,3.6, height 0.75
QFN56_7X7_EXP-M [mm]
  rect 0.85x0.2 smd paste+0 mask+0: 1(-3.5,2.6) 2(-3.5,2.2) 3(-3.5,1.8) 4(-3.5,1.4) 5(-3.5,1) 6(-3.5,0.6) 7(-3.5,0.2) 8(-3.5,-0.2) 9(-3.5,-0.6) 10(-3.5,-1) 11(-3.5,-1.4) 12(-3.5,-1.8) 13(-3.5,-2.2) 14(-3.5,-2.6) 29(3.5,-2.6) 30(3.5,-2.2) 31(3.5,-1.8) 32(3.5,-1.4) 33(3.5,-1) 34(3.5,-0.6) 35(3.5,-0.2) 36(3.5,0.2) 37(3.5,0.6) 38(3.5,1) 39(3.5,1.4) 40(3.5,1.8) 41(3.5,2.2) 42(3.5,2.6)
  rect 0.2x0.85 smd paste+0 mask+0: 15(-2.6,-3.5) 16(-2.2,-3.5) 17(-1.8,-3.5) 18(-1.4,-3.5) 19(-1,-3.5) 20(-0.6,-3.5) 21(-0.2,-3.5) 22(0.2,-3.5) 23(0.6,-3.5) 24(1,-3.5) 25(1.4,-3.5) 26(1.8,-3.5) 27(2.2,-3.5) 28(2.6,-3.5) 43(2.6,3.5) 44(2.2,3.5) 45(1.8,3.5) 46(1.4,3.5) 47(1,3.5) 48(0.6,3.5) 49(0.2,3.5) 50(-0.2,3.5) 51(-0.6,3.5) 52(-1,3.5) 53(-1.4,3.5) 54(-1.8,3.5) 55(-2.2,3.5) 56(-2.6,3.5)
  rect 4.039x4.039 smd paste-2.019 mask+0: 57(0,0)
  silkscreen extent -4.7,-4.43 4.43,4.7, body extent -3.52,-3.52 3.52,3.52, height 0.89
RHA0040H [mm]
  rect 0.6x0.25 smd paste+0 mask+0: 1(-2.9,2.25) 2(-2.9,1.75) 3(-2.9,1.25) 4(-2.9,0.75) 5(-2.9,0.25) 6(-2.9,-0.25) 7(-2.9,-0.75) 8(-2.9,-1.25) 9(-2.9,-1.75) 10(-2.9,-2.25) 21(2.9,-2.25) 22(2.9,-1.75) 23(2.9,-1.25) 24(2.9,-0.75) 25(2.9,-0.25) 26(2.9,0.25) 27(2.9,0.75) 28(2.9,1.25) 29(2.9,1.75) 30(2.9,2.25)
  rect 0.25x0.6 smd paste+0 mask+0: 11(-2.25,-2.9) 12(-1.75,-2.9) 13(-1.25,-2.9) 14(-0.75,-2.9) 15(-0.25,-2.9) 16(0.25,-2.9) 17(0.75,-2.9) 18(1.25,-2.9) 19(1.75,-2.9) 20(2.25,-2.9) 31(2.25,2.9) 32(1.75,2.9) 33(1.25,2.9) 34(0.75,2.9) 35(0.25,2.9) 36(-0.25,2.9) 37(-0.75,2.9) 38(-1.25,2.9) 39(-1.75,2.9) 40(-2.25,2.9)
  rect 4.5x4.5 smd paste-2.237 mask+0: 41(0,0)
  round 0.5 hole 0.3 paste-2539.97 mask+0: V(-2,-0.73) V(-2,0.73) V(-0.73,-2) V(-0.73,-0.73) V(-0.73,0.73) V(-0.73,2) V(0.73,-2) V(0.73,-0.73) V(0.73,0.73) V(0.73,2) V(2,-0.73) V(2,0.73)
  silkscreen extent -3.22,-3.22 3.22,3.23, body extent -3,-3 3,3, height 1
SIL0008D_SMD [mm]
  rect 0.6x0.5 smd paste-0.05 mask-0.051: 1(-1.05,0.975) 2(-1.05,0.325) 3(-1.05,-0.325) 4(-1.05,-0.975) 5(1.05,-0.975) 6(1.05,-0.325) 7(1.05,0.325) 8(1.05,0.975)
  rect 1.2x2 smd paste-0.6 mask-0.051: 9(0,0)
  silkscreen extent -1.53,-1.63 1.53,1.63, body extent -1.4,-1.56 1.4,1.44, height 1.31
SOD123 [mm]
  rrect50% 0.91x1.22 smd: A(-1.7,0) C(1.7,0)
  silkscreen extent -0.5,-0.5 0.5,0.5, body extent -1.93,-0.9 1.93,0.9, height 1.22
SON35P100X50-6N [mm] "SON, 6-Leads, Body 1.00x1.00mm, Pitch 0.35mm, IPC Medium Density"
  rect 0.55x0.15 smd: 1(-0.565,0.35) 2(-0.565,0) 3(-0.565,-0.35) 4(0.565,-0.35) 5(0.565,0) 6(0.565,0.35)
  silkscreen extent -1.1,0.59 -1,0.69, body extent -0.55,-0.55 0.55,0.55, height 0.5
SOT23-5 [mm]
  rrect25% 0.8x0.6 smd: 1(-1.2,0.95) 2(-1.2,0) 3(-1.2,-0.95) 4(1.2,-0.95) 5(1.2,0.95)
  silkscreen extent -0.51,-1.35 0.51,1.35, body extent -1.4,-1.45 1.4,1.45, height 1.44
SW_B3U-1000P [mm]
  rect 0.8x1.7 smd: 1(-1.7,0) 2(1.7,0)
  silkscreen extent -2.8,-1.25 1.5,1.25, body extent -2,-1.25 2,1.25, height 1.75
TANG-40PIN [mm]
  rrect50% 1.6x1.6 hole 1.1: 1(-24.13,1.27)
  round 1.6 hole 1.1: 2(-24.13,-1.27) 3(-21.59,1.27) 4(-21.59,-1.27) 5(-19.05,1.27) 6(-19.05,-1.27) 7(-16.51,1.27) 8(-16.51,-1.27) 9(-13.97,1.27) 10(-13.97,-1.27) 11(-11.43,1.27) 12(-11.43,-1.27) 13(-8.89,1.27) 14(-8.89,-1.27) 15(-6.35,1.27) 16(-6.35,-1.27) 17(-3.81,1.27) 18(-3.81,-1.27) 19(-1.27,1.27) 20(-1.27,-1.27) 21(1.27,1.27) 22(1.27,-1.27) 23(3.81,1.27) 24(3.81,-1.27) 25(6.35,1.27) 26(6.35,-1.27) 27(8.89,1.27) 28(8.89,-1.27) 29(11.43,1.27) 30(11.43,-1.27) 31(13.97,1.27) 32(13.97,-1.27) 33(16.51,1.27) 34(16.51,-1.27) 35(19.05,1.27) 36(19.05,-1.27) 37(21.59,1.27) 38(21.59,-1.27) 39(24.13,1.27) 40(24.13,-1.27)
  silkscreen extent -25.4,-2.54 25.4,2.54, body extent -25.65,-2.52 25.65,2.48, height 8.5
TestPoint [mm]
  round 1 hole 0.4: 1(0,0)
TSSOP16 [mm] "TSOP, 16-Leads, Body 5,00x4,40mm, Pitch 0,65mm, IPC High Density"
  oval 1.15x0.4 smd: 1(-2.85,2.275) 2(-2.85,1.625) 3(-2.85,0.975) 4(-2.85,0.325) 5(-2.85,-0.325) 6(-2.85,-0.975) 7(-2.85,-1.625) 8(-2.85,-2.275) 9(2.85,-2.275) 10(2.85,-1.625) 11(2.85,-0.975) 12(2.85,-0.325) 13(2.85,0.325) 14(2.85,0.975) 15(2.85,1.625) 16(2.85,2.275)
  silkscreen extent -1.88,-2.5 1.88,2.5, body extent -3.2,-2.5 3.2,2.5, height 1.2
WQFN64_NKD_TEX [mil]
  rect 31.81x10.03 smd paste+0 mask+0: 1(-174.91,147.67) 2(-174.91,127.98) 3(-174.91,108.3) 4(-174.91,88.61) 5(-174.91,68.91) 6(-174.91,49.22) 7(-174.91,29.53) 8(-174.91,9.84) 9(-174.91,-9.85) 10(-174.91,-29.54) 11(-174.91,-49.23) 12(-174.91,-68.91) 13(-174.91,-88.61) 14(-174.91,-108.3) 15(-174.91,-127.99) 16(-174.91,-147.68) 33(174.91,-147.68) 34(174.91,-127.99) 35(174.91,-108.3) 36(174.91,-88.61) 37(174.91,-68.91) 38(174.91,-49.23) 39(174.91,-29.54) 40(174.91,-9.85) 41(174.91,9.84) 42(174.91,29.53) 43(174.91,49.22) 44(174.91,68.91) 45(174.91,88.61) 46(174.91,108.3) 47(174.91,127.98) 48(174.91,147.67)
  rect 10.03x31.81 smd paste+0 mask+0: 17(-147.67,-174.91) 18(-127.99,-174.91) 19(-108.29,-174.91) 20(-88.6,-174.91) 21(-68.92,-174.91) 22(-49.22,-174.91) 23(-29.53,-174.91) 24(-9.84,-174.91) 25(9.85,-174.91) 26(29.53,-174.91) 27(49.23,-174.91) 28(68.92,-174.91) 29(88.6,-174.91) 30(108.3,-174.91) 31(127.99,-174.91) 32(147.67,-174.91) 49(147.67,174.91) 50(127.99,174.91) 51(108.3,174.91) 52(88.6,174.91) 53(68.92,174.91) 54(49.23,174.91) 55(29.53,174.91) 56(9.85,174.91) 57(-9.84,174.91) 58(-29.53,174.91) 59(-49.22,174.91) 60(-68.92,174.91) 61(-88.6,174.91) 62(-108.29,174.91) 63(-127.99,174.91) 64(-147.67,174.91)
  rect 287x287 smd paste-99999 mask+0: 65(0,0)
  silkscreen extent -246,-211 211,211, body extent -179,-179 179,179, height 32